# Altium PCB PCB_Z35.PcbDoc (part 1 of 3)
Units mm, origin at the board's own origin, x right, y up, seen from the top; angles counter-clockwise.
Board outline 116.46 x 196.34 mm, 2 copper layers (Top Layer, Bottom Layer), stack 1.671 mm thick; 178 components, 183 nets, 705 pads, 291 vias.
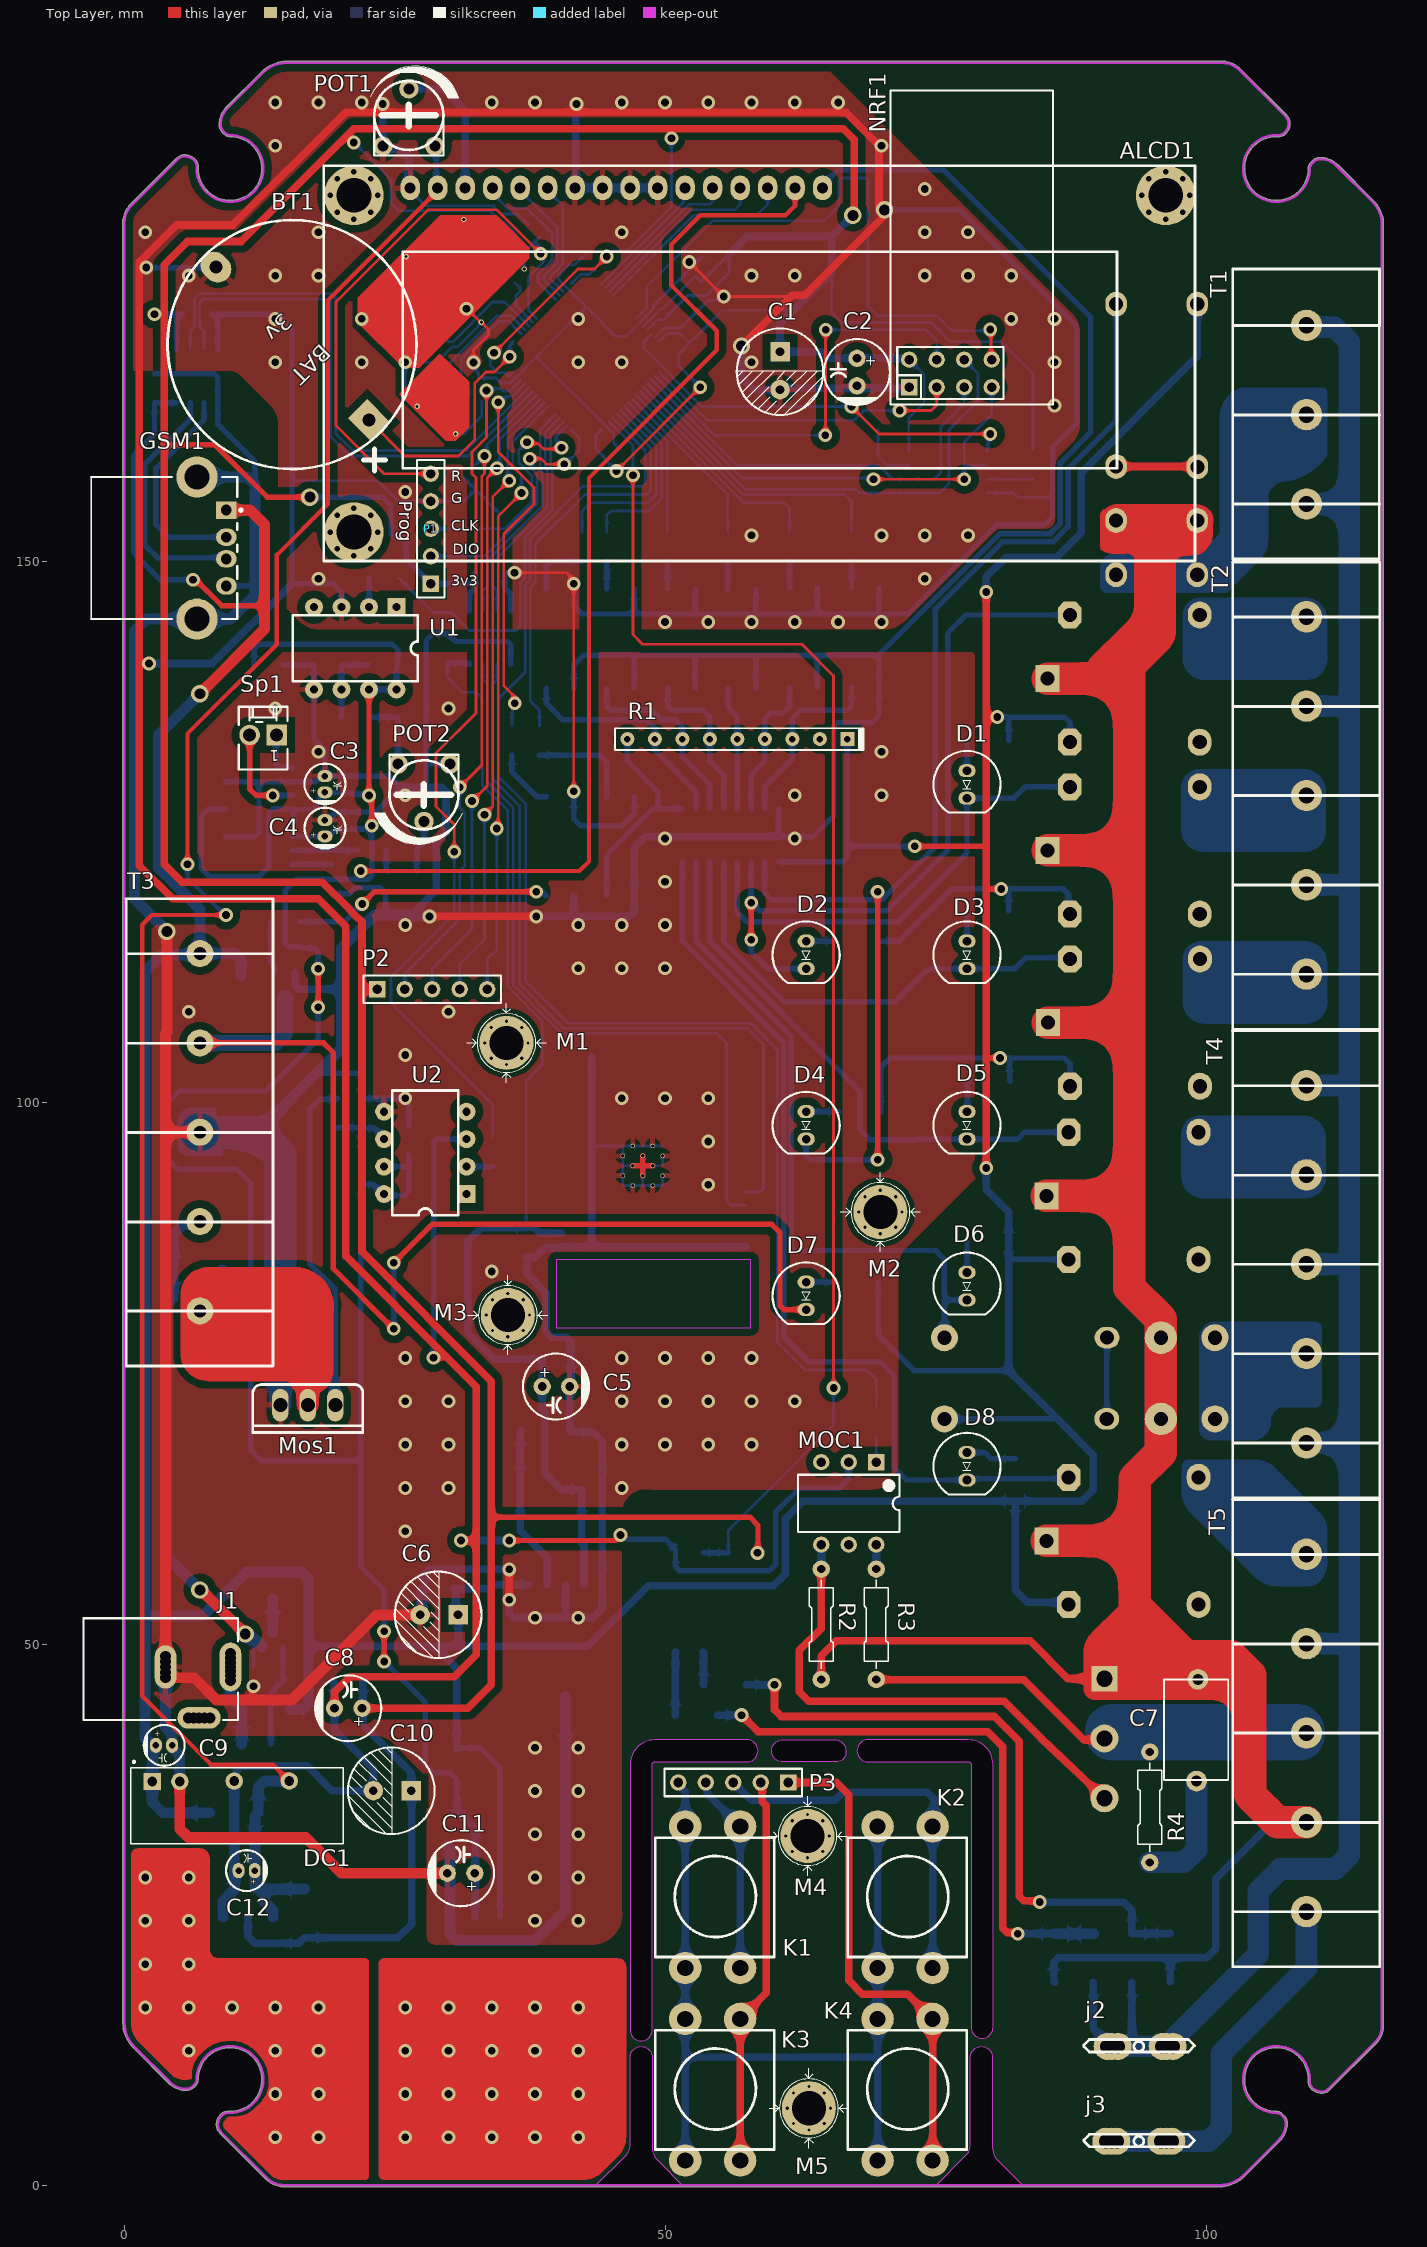
[diagram p0: Top Layer view]
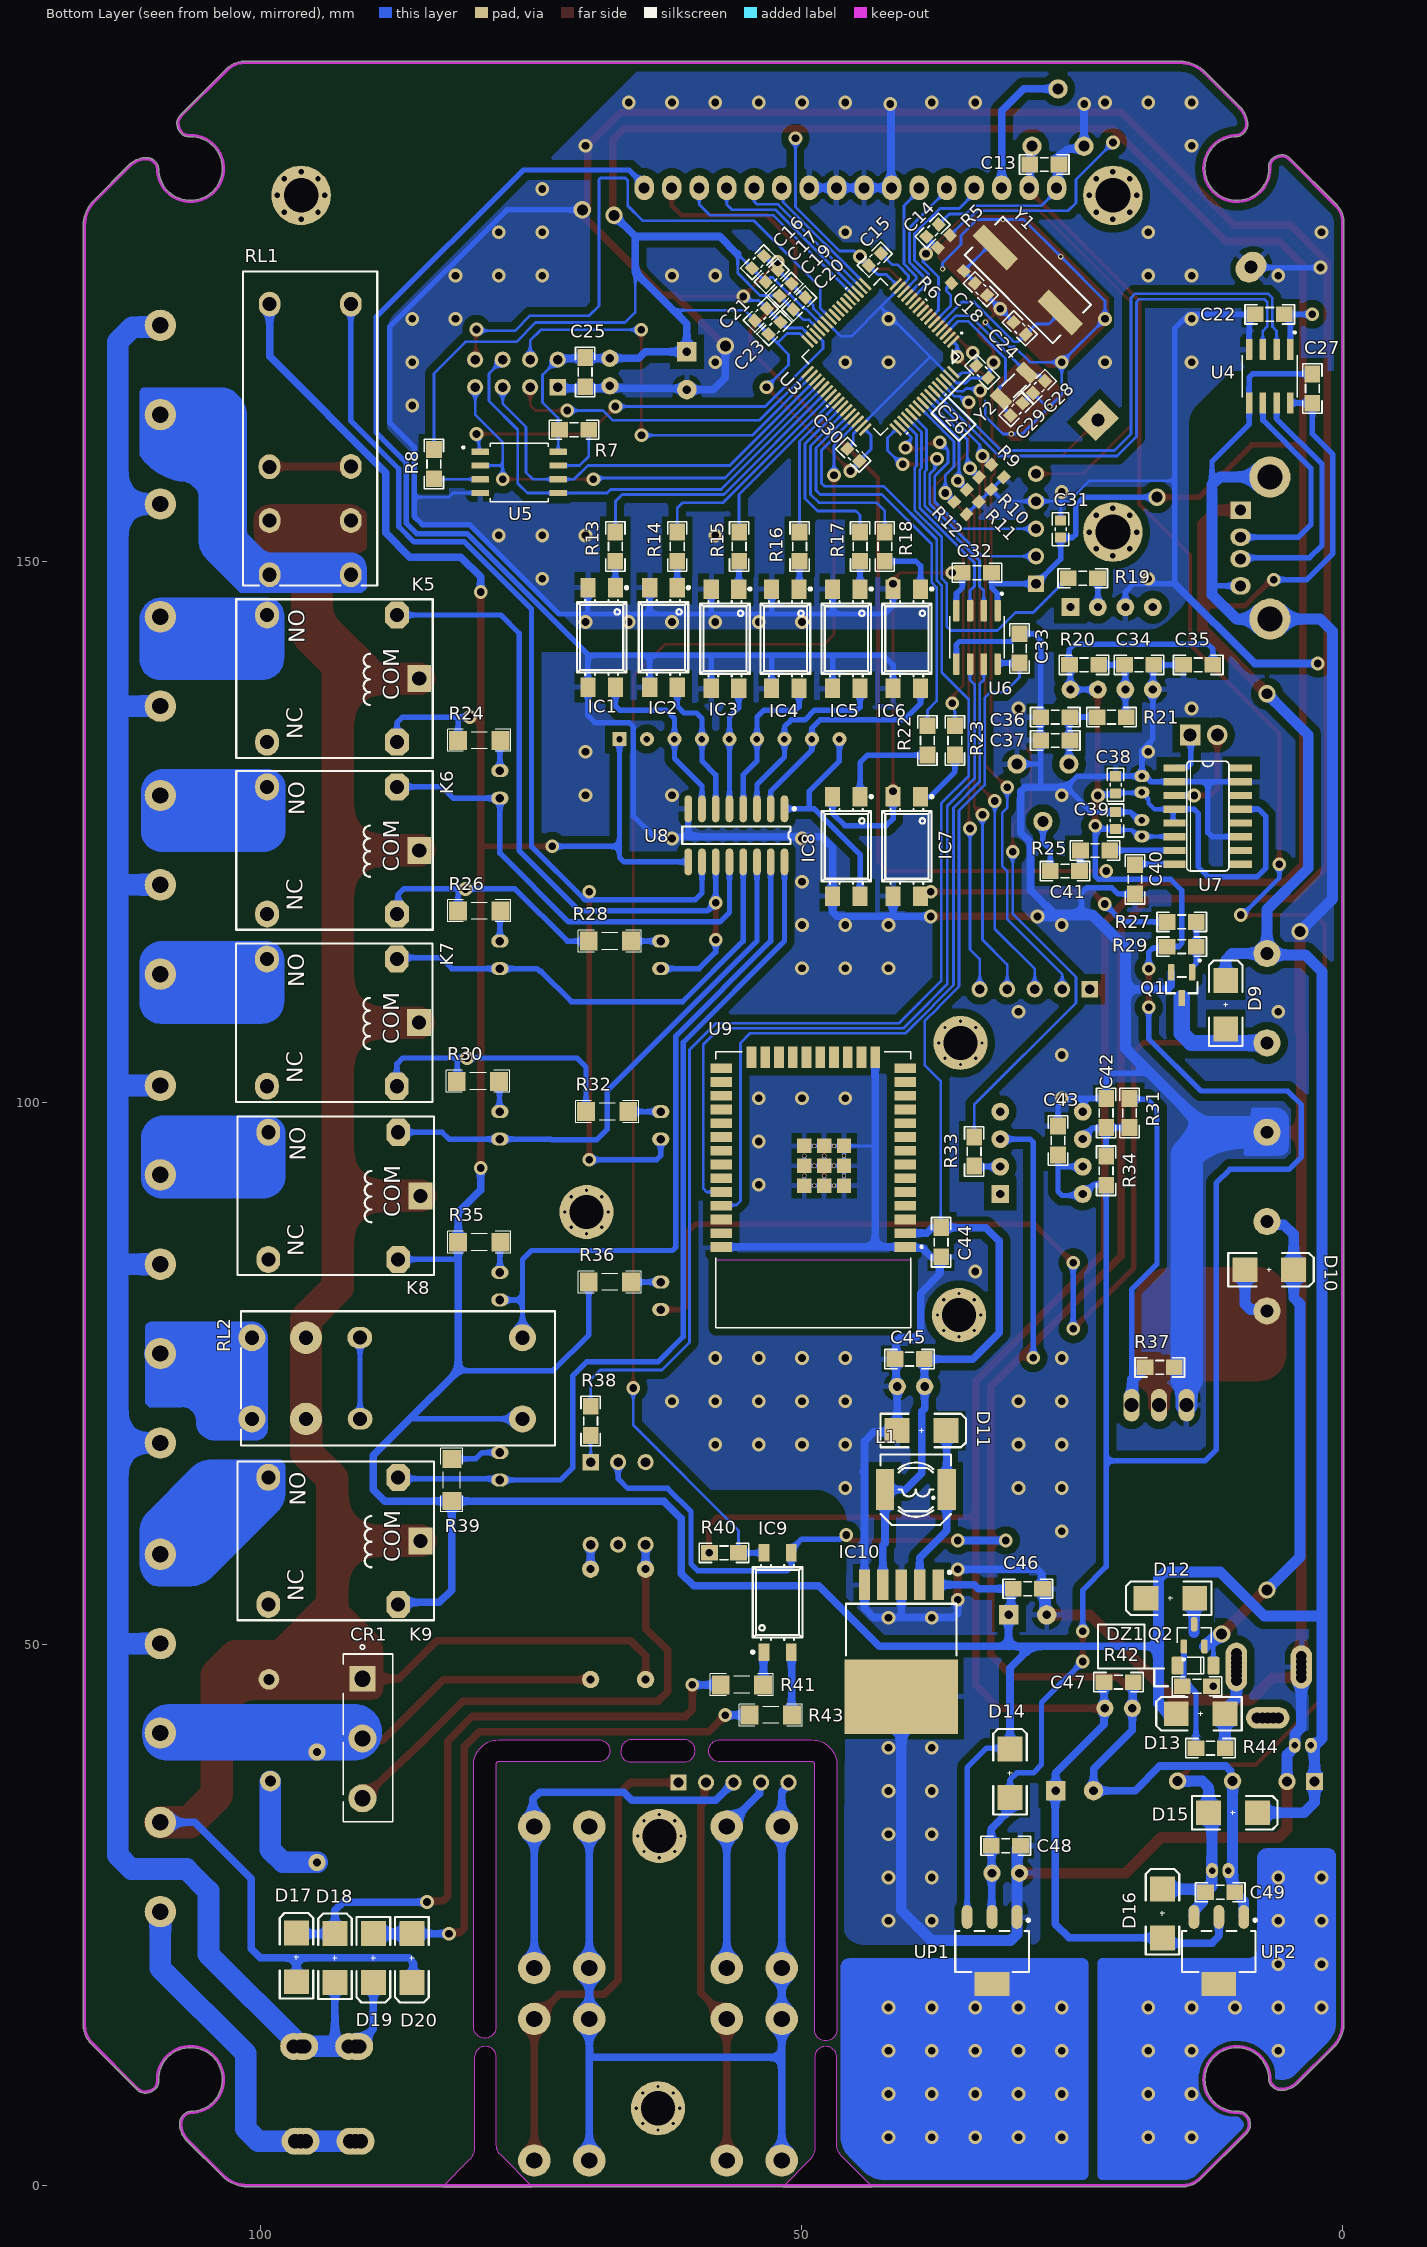
[diagram p1: Bottom Layer view, seen from below]

## Layer stack, top to bottom
Top Solder: solder mask 0.0102, Solder Resist, Dk 3.5
Top Layer: signal copper 0.0356
Dielectric 1: dielectric 1.6, FR-4, Dk 4.8
Bottom Layer: signal copper 0.0356
Bottom Solder: solder mask 0.0102, Solder Resist, Dk 3.5

## Board outline
4.107,9.429 ccw(c5.715,11.036) 5.715,8.763 ccw(c5.715,9.81) 6.455,9.069 6.579,9.193 ccw(c5.993,9.778) 6.821,9.778 cw(c9.766,9.766) 12.711,9.766 cw(c9.766,9.766) 9.779,6.821 9.541,6.821 ccw(c9.541,5.953) 8.927,6.567 8.905,6.545 ccw(c9.862,5.588) 8.509,5.588 ccw(c9.556,5.588) 8.815,4.848 13.124,0.539 ccw(c14.732,2.146) 14.404,-0.104 14.478,-0.127 101.219,-0.127 ccw(c101.219,3.066) 103.477,0.808 106.776,4.107 ccw(c105.169,5.715) 107.442,5.715 ccw(c106.395,5.715) 107.136,6.455 107.012,6.579 ccw(c106.427,5.993) 106.427,6.821 cw(c106.439,9.766) 109.384,9.766 cw(c106.441,9.766) 109.376,9.551 109.385,9.493 ccw(c110.252,9.541) 109.638,8.927 109.66,8.905 ccw(c110.617,9.862) 110.617,8.509 ccw(c110.617,9.556) 111.357,8.815 115.666,13.124 ccw(c114.059,14.732) 116.309,14.404 116.332,14.478 116.332,16.129 116.332,16.132 116.332,181.099 116.332,181.102 ccw(c113.139,181.102) 115.397,183.36 112.098,186.659 ccw(c110.49,185.052) 110.49,187.325 ccw(c110.49,186.278) 109.75,187.019 109.626,186.895 ccw(c110.212,186.31) 109.384,186.31 cw(c106.439,186.322) 106.669,189.258 106.733,189.269 ccw(c106.664,190.135) 107.278,189.521 107.3,189.543 ccw(c106.343,190.5) 107.696,190.5 ccw(c106.649,190.5) 107.39,191.24 103.081,195.549 ccw(c101.473,193.942) 101.801,196.192 101.727,196.215 100.076,196.215 14.986,196.215 ccw(c14.986,193.022) 12.728,195.28 9.429,191.981 ccw(c11.036,190.373) 8.763,190.373 ccw(c9.81,190.373) 9.047,189.656 9.06,189.642 9.187,189.515 9.193,189.509 ccw(c9.778,190.095) 9.778,189.267 cw(c9.766,186.322) 12.711,186.322 cw(c9.766,186.322) 6.829,186.537 6.82,186.595 ccw(c5.953,186.547) 6.567,187.161 6.545,187.183 ccw(c5.588,186.226) 5.588,187.579 ccw(c5.588,186.532) 4.848,187.273 0.539,182.964 ccw(c2.146,181.356) -0.104,181.684 -0.127,181.61 -0.127,179.959 -0.127,15.494 -0.127,14.986 ccw(c3.066,14.986) 0.808,12.728
cut-out: 74.866,-0.127 77.787,2.794 ccw(c76.868,3.714) 78.168,3.714 78.168,11.811 cw(c79.184,11.811) 79.184,12.827 cw(c79.184,11.811) 80.2,11.811 80.2,3.513 ccw(c81.935,3.513) 80.709,2.286 83.122,-0.127
cut-out: 68.707,41.148 ccw(c68.707,40.132) 67.691,40.132 ccw(c68.707,40.132) 68.707,39.116 77.978,39.116 cw(c77.978,38.862) 78.232,38.862 78.232,14.605 ccw(c79.248,14.605) 79.248,13.589 ccw(c79.248,14.605) 80.264,14.605 80.264,38.862 ccw(c77.978,38.862) 77.978,41.148
cut-out: 65.659,41.148 cw(c65.659,40.132) 66.675,40.132 66.675,40.005 cw(c65.786,40.005) 65.786,39.116 60.833,39.116 cw(c60.833,40.132) 59.817,40.132 cw(c60.833,40.132) 60.833,41.148
cut-out: 46.736,14.351 ccw(c47.752,14.351) 47.752,13.335 ccw(c47.752,14.351) 48.768,14.351 48.768,38.862 cw(c49.022,38.862) 49.022,39.116 57.531,39.116 ccw(c57.531,40.132) 58.547,40.132 ccw(c57.531,40.132) 57.531,41.148 49.022,41.148 ccw(c49.022,38.862) 46.736,38.862
cut-out: 43.434,-0.127 46.355,2.794 ccw(c45.435,3.714) 46.736,3.714 46.736,11.811 cw(c47.752,11.811) 47.752,12.827 cw(c47.752,11.811) 48.768,11.811 48.768,3.512 ccw(c50.502,3.512) 49.276,2.286 51.689,-0.127

## Design rules (kind name [scope] priority, off if disabled: settings)
Clearance [All] p1: gap=0.21 ignorepadtopadclearanceinfootprint=FALSE except(0.7: Arc-Poly Track-Poly SMDPad-Poly THPad-Poly Via-Poly Fill-Poly Poly-Poly Poly-Region Poly-Text Poly-Hole)
ComponentClearance [All] p1: gap=-10 collisioncheckmode=3 verticalgap=-10 showdistances=FALSE
Height [All] p1: minheight=0 maxheight=100.4 prefheight=12.7
PlaneConnect [All] p1: planeconnectstyle=Relief reliefexpansion=0.508 reliefentries=4 reliefconductorwidth=0.4 reliefairgap=0.4
PolygonConnect [All] p1: thpad.connectstyle=Relief thpad.reliefconductorwidth=0.5 thpad.reliefentries=4 thpad.polygonreliefangle="90 Angle" thpad.airgapwidth=0.5 smdpad.connectstyle=Relief smdpad.reliefconductorwidth=0.5 smdpad.reliefentries=4 smdpad.polygonreliefangle="90 Angle" smdpad.airgapwidth=0.5 via.connectstyle=Direct via.reliefconductorwidth=0 via.reliefentries=4 via.polygonreliefangle="90 Angle" via.airgapwidth=0
RoutingVias [All] p1: holewidth=0.711 width=1.27 viastyle="Through Hole" minholewidth=0.3 minwidth=0.3 maxholewidth=2 maxwidth=3
SolderMaskExpansion [All] p1: expansion=0.102 istentingtop=FALSE
SupplyNets "Schematic Supply Nets_4" [InNet('GND')] p1: voltage=0.000
SupplyNets "Schematic Supply Nets_3" [InNet('GND-3.3v')] p2: voltage=0.000
SupplyNets "Schematic Supply Nets_2" [InNet('3.3v')] p3: voltage=0.000
SupplyNets "Schematic Supply Nets_1" [InNet('+5')] p4: voltage=0.000
SupplyNets "Schematic Supply Nets" [InNet('GND-12v')] p5: voltage=0.000
Width [All] p1: maxlimit=3 minlimit=0.25 preferedwidth=0.65
27 further rules are at their usual default settings.

## Components (designator, comment, footprint, x,y, rotation, side; value= is the part's Value field where it differs from the comment)
ALCD1 "LCD" "LCD 16x2" 26.416,184.531 r0 top
BT1 "CR2032" "BAT BACKUP" 22.606,163.068 r225 top
C1 "1000uF" "Cap electrolitic radial 8x14-3.5" 60.579,167.64 r270 top value=1uF (schematic designator C6)
C2 "10uF" "Cap electrolitic radial 6.3x12-2.5" 67.691,168.783 r270 top value=1uF (schematic designator C41)
C3 "10uF" "Cap electrolitic radial 4x7-1.5" 18.535,128.686 r90 top value=1uF (schematic designator C7)
C4 "100uF" "Cap electrolitic radial 4x7-1.5" 18.542,124.611 r90 top value=1uF (schematic designator C11)
C5 "220uF" "Cap electrolitic radial 6.3x12-2.5" 38.608,73.787 r0 top value=1uF (schematic designator C13)
C6 "1000uF" "Cap electrolitic radial 8x14-3.5" 29.083,52.697 r180 top value=1uF (schematic designator C15)
C7 "100nF/400v" "Cap - 100nF - 400V" 99.06,38.227 r90 top (schematic designator C4)
C8 "10uF" "Cap electrolitic radial 6.3x12-2.5" 21.963,44.069 r180 top value=1uF (schematic designator C22)
C9 "2.2uF-50v" "Cap electrolitic radial 4x7-1.5" 2.921,40.64 r0 top value=1uF (schematic designator C25)
C10 "1000u" "Cap electrolitic radial 8x14-3.5" 24.757,36.449 r180 top value=1uF (schematic designator C23)
C11 "10uF" "Cap electrolitic radial 6.3x12-2.5" 32.385,28.829 r180 top value=1uF (schematic designator C37)
C12 "10uF-50v" "Cap electrolitic radial 4x7-1.5" 12.053,29.067 r180 top value=1uF (schematic designator C26)
C13 "100nF" CAPC3413X12N 27.559,186.69 r180 bottom (schematic designator C1)
C14 "100nF" CAPC1608X90 37.846,180.594 r135 bottom (schematic designator C30)
C15 "100nF" CAPC1608X90 43.18,177.927 r135 bottom (schematic designator C20)
C16 "1uF" CAPC1608X90 53.975,177.673 r135 bottom (schematic designator C33)
C17 "100nF" CAPC1608X90 52.705,176.403 r135 bottom (schematic designator C34)
C18 "15pF" CAPC1608X90 33.401,175.133 r225 bottom (schematic designator C36)
C19 "1uF" CAPC1608X90 51.435,175.133 r135 bottom (schematic designator C28)
C20 "10nF" CAPC1608X90 50.165,173.863 r135 bottom (schematic designator C29)
C21 "4.7uF" CAPC1608X90 53.721,172.847 r135 bottom (schematic designator C17)
C22 "100nF" CAPC3413X12N 6.731,172.847 r0 bottom (schematic designator C48)
C23 "100nF" CAPC1608X90 52.451,171.577 r135 bottom (schematic designator C19)
C24 "15pF" CAPC1608X90 29.845,171.577 r45 bottom (schematic designator C35)
C25 "100nF" CAPC3413X12N 69.977,167.513 r90 bottom (schematic designator C5)
C26 "100nF" CAPC1608X90 33.274,167.513 r225 bottom (schematic designator C21)
C27 "100nF" CAPC3413X12N 2.794,165.989 r90 bottom (schematic designator C47)
C28 "15pF" CAPC1608X90 28.067,166.116 r315 bottom (schematic designator C32)
C29 "15pF" CAPC1608X90 30.099,164.084 r135 bottom (schematic designator C31)
C30 "100nF" CAPC1608X90 45.212,159.893 r45 bottom (schematic designator C18)
C31 "100nF" CAPC1608X90 26.035,153.035 r90 bottom (schematic designator C40)
C32 "100nF" CAPC3413X12N 33.782,148.971 r0 bottom (schematic designator C44)
C33 "100nF" CAPC3413X12N 29.845,141.986 r90 bottom (schematic designator C43)
C34 "15pF" CAPC3413X12N 18.796,140.462 r180 bottom (schematic designator C42)
C35 "100nF" CAPC3413X12N 13.335,140.462 r0 bottom (schematic designator C38)
C36 "100nF" CAPC3413X12N 26.543,135.636 r0 bottom (schematic designator C45)
C37 "100nF" CAPC3413X12N 26.543,133.477 r0 bottom (schematic designator C46)
C38 "100nF" CAPC1608X90 20.955,129.413 r90 bottom (schematic designator C8)
C39 "100nF" CAPC1608X90 20.955,126.111 r90 bottom (schematic designator C9)
C40 "100nF" CAPC3413X12N 19.177,120.65 r270 bottom (schematic designator C10)
C41 "470nF" CAPC3413X12N 25.654,121.412 r0 bottom (schematic designator C12)
C42 "15pF" CAPC3413X12N 21.844,99.06 r90 bottom (schematic designator C3)
C43 "100nF" CAPC3413X12N 26.289,96.52 r90 bottom (schematic designator C2)
C44 "100nF" CAPC3413X12N 37.084,87.122 r270 bottom (schematic designator C49)
C45 "100nF" CAPC3413X12N 40.005,76.327 r0 bottom (schematic designator C14)
C46 "100nF" CAPC3413X12N 29.083,55.11 r180 bottom (schematic designator C16)
C47 "100nF" CAPC3413X12N 20.693,46.482 r180 bottom (schematic designator C24)
C48 "100nF" CAPC3413X12N 31.115,31.369 r180 bottom (schematic designator C39)
C49 "100nF" CAPC3413X12N 11.303,27.067 r180 bottom (schematic designator C27)
CR1 "BTA41" BTA41 115.951,78.296 r270 bottom
D1 "LED 5MM" LED5MM_YELLOW 77.851,129.413 r270 top (schematic designator D3)
D2 "LED 5MM" LED5MM_YELLOW 62.992,113.665 r270 top (schematic designator D1)
D3 "LED 5MM" LED5MM_YELLOW 77.851,113.665 r270 top (schematic designator D4)
D4 "LED 5MM" LED5MM_YELLOW 62.992,97.917 r270 top (schematic designator D6)
D5 "LED 5MM" LED5MM_YELLOW 77.851,97.917 r270 top (schematic designator D2)
D6 "LED 5MM" LED5MM_YELLOW 77.851,83.058 r270 top (schematic designator D8)
D7 "LED 5MM" LED5MM_YELLOW 62.992,82.169 r270 top (schematic designator D13)
D8 "LED 5MM" LED5MM_YELLOW 77.851,66.421 r270 top (schematic designator D5)
D9 "SMD 1N4007" "DIODE SMD" 10.795,106.807 r90 bottom (schematic designator D10)
D10 "SMD 1N4007" "DIODE SMD" 9.017,84.582 r180 bottom (schematic designator D7)
D11 "SS34" "DIODE SMD" 41.148,69.723 r180 bottom (schematic designator D15)
D12 "SS34" "DIODE SMD" 13.661,54.229 r0 bottom (schematic designator D19)
D13 "SS34" "DIODE SMD" 10.867,43.561 r0 bottom (schematic designator D20)
D14 "SMD 1N4007" "DIODE SMD" 30.726,35.814 r90 bottom (schematic designator D18)
D15 "SMD 1N4007" "DIODE SMD" 12.374,34.417 r180 bottom (schematic designator D16)
D16 "SMD 1N4007" "DIODE SMD" 16.637,22.86 r90 bottom (schematic designator D17)
D17 "SMD 1N4007" "DIODE SMD" 96.647,18.796 r90 bottom (schematic designator D14)
D18 "SMD 1N4007" "DIODE SMD" 93.091,18.741 r90 bottom (schematic designator D11)
D19 "SMD 1N4007" "DIODE SMD" 89.535,23.241 r270 bottom (schematic designator D9)
D20 "SMD 1N4007" "DIODE SMD" 85.979,23.241 r270 bottom (schematic designator D12)
DC1 "B1205S-2WR3" CONV_RKZE-1205S/HP 10.414,35.052 r0 top
DZ1 "6.2V" "SOD80, LL-34" 13.589,48.006 r0 bottom value=12V
GSM1 "USB Connector" USB2.5-2H4C 3.937,151.257 r180 top
IC1 "PC817" WURTH_140817143400#1 68.453,143.002 r270 bottom
IC2 "PC817" WURTH_140817143400#1 62.738,143.002 r270 bottom (schematic designator IC3)
IC3 "PC817" WURTH_140817143400#1 57.056,142.875 r270 bottom (schematic designator IC5)
IC4 "PC817" WURTH_140817143400#1 51.476,142.875 r270 bottom (schematic designator IC7)
IC5 "PC817" WURTH_140817143400#1 45.847,142.875 r270 bottom (schematic designator IC2)
IC6 "PC817" WURTH_140817143400#1 40.259,142.875 r270 bottom (schematic designator IC4)
IC7 "PC817" WURTH_140817143400#1 40.259,123.698 r270 bottom (schematic designator IC9)
IC8 "PC817" WURTH_140817143400#1 45.847,123.698 r270 bottom (schematic designator IC6)
IC9 "PC817" WURTH_140817143400#2 52.197,53.848 r90 bottom (schematic designator IC10)
IC10 "LM2596-3v3" TO170P1435X465-6N-R1041X635 40.767,49.276 r270 bottom (schematic designator IC8)
J1 "DC Power Jack" "DC Power Jack 1" 9.81,48.679 r0 top
j2 "Cooler Conector" "Cooler Conector" 91.186,12.827 r0 top (schematic designator j3)
j3 "Cooler Conector" "Cooler Conector" 91.186,4.064 r0 top (schematic designator j2)
K1 "Key-12*12" Switch_11_11 48.006,37.973 r270 top (schematic designator K6)
K2 "Key-12*12" Switch_11_11 65.786,37.973 r270 top (schematic designator K7)
K3 "Key-12*12" Switch_11_11 48.006,20.193 r270 top (schematic designator K8)
K4 "Key-12*12" Switch_11_11 65.786,20.193 r270 top (schematic designator K9)
K5 "Relay" "Relay 18.85x15.35x15.70" 92.329,139.192 r90 bottom (schematic designator K1)
K6 "Relay" "Relay 18.85x15.35x15.70" 92.329,123.317 r90 bottom (schematic designator K3)
K7 "Relay" "Relay 18.85x15.35x15.70" 92.351,107.409 r90 bottom (schematic designator K4)
K8 "Relay" "Relay 18.85x15.35x15.70" 92.224,91.407 r90 bottom (schematic designator K2)
K9 "Relay" "Relay 18.85x15.35x15.70" 92.224,59.53 r90 bottom (schematic designator K5)
L1 "33uH" IND_PANASONIC_ELL6RH 39.426,64.262 r0 bottom
M1 "Screw3mm" "Board Screw 3mm" 35.306,105.537 r0 top (schematic designator M3)
M2 "Screw3mm" "Board Screw 3mm" 69.85,89.916 r0 top (schematic designator M5)
M3 "Screw3mm" "Board Screw 3mm" 35.433,80.391 r0 top (schematic designator M4)
M4 "Screw3mm" "Board Screw 3mm" 63.119,32.258 r0 top (schematic designator M2)
M5 "Screw3mm" "Board Screw 3mm" 63.246,7.112 r0 top (schematic designator M1)
MOC1 "MOC3021" DIP-6 66.929,62.992 r270 top
Mos1 "IRFZ44" TO-220 16.955,72.072 r180 top
NRF1 "NRF24L01+" NRF24L01P 72.517,166.116 r0 top
P1 "Prog" HDR1X5 28.321,147.955 r90 top (schematic designator P3)
P2 "Header 5" HDR1X5 23.368,110.49 r0 top locked (schematic designator P1)
P3 "Header 5" HDR1X5 61.341,37.211 r180 top (schematic designator P2)
POT1 "10K" "POT 4" 26.289,191.025 r0 top
POT2 "10K" "POT 4" 27.686,128.651 r180 top
Q1 "AO3400-5.8A" SOT95P260X140-3N 14.859,110.871 r270 bottom (schematic designator Q2)
Q2 "IRLML6402TRPBF" SOT95P237X112-3N 13.716,50.8 r90 bottom (schematic designator Q3)
R1 "Array Resistor-4K7" "Res Array" 66.802,133.604 r270 top value=4K7 (schematic designator R44)
R2 "360R" "Axial 0_25 W, 0_4 IN LEAD PITCH" 64.389,51.816 r90 top (schematic designator R22)
R3 "360R" "Axial 0_25 W, 0_4 IN LEAD PITCH" 69.469,51.816 r90 top (schematic designator R20)
R4 "100R" "Axial 0_25 W, 0_4 IN LEAD PITCH" 94.742,34.925 r270 top (schematic designator R16)
R5 "10K" RESC1608X55N 36.83,179.578 r135 bottom value=100k (schematic designator R38)
R6 "1K2" RESC1608X55N 35.56,176.276 r315 bottom value=100k (schematic designator R39)
R7 "10K" RESC3413X04N 70.993,162.179 r0 bottom (schematic designator R32)
R8 "10K" RESC3413X04N 83.947,159.004 r90 bottom (schematic designator R30)
R9 "10K" RESC1608X55N 31.877,158.369 r45 bottom value=100k (schematic designator R33)
R10 "10K" RESC1608X55N 33.02,157.226 r45 bottom value=100k (schematic designator R34)
R11 "10K" RESC1608X55N 34.163,156.083 r45 bottom value=100k (schematic designator R35)
R12 "10K" RESC1608X55N 35.306,154.94 r45 bottom value=100k (schematic designator R36)
R13 "270R" RESC3413X04N 67.183,151.384 r90 bottom (schematic designator R1)
R14 "270R" RESC3413X04N 61.468,151.384 r90 bottom (schematic designator R5)
R15 "270R" RESC3413X04N 55.753,151.384 r90 bottom (schematic designator R8)
R16 "270R" RESC3413X04N 50.165,151.384 r90 bottom (schematic designator R12)
R17 "270R" RESC3413X04N 44.577,151.384 r90 bottom (schematic designator R2)
R18 "270R" RESC3413X04N 42.291,151.384 r90 bottom (schematic designator R6)
R19 "270R" RESC3413X04N 24.003,148.463 r0 bottom (schematic designator R28)
R20 "220R" RESC3413X04N 23.876,140.462 r0 bottom (schematic designator R13)
R21 "1K" RESC3413X04N 21.336,135.636 r180 bottom (schematic designator R40)
R22 "270R" RESC3413X04N 38.354,133.477 r90 bottom (schematic designator R9)
R23 "270R" RESC3413X04N 35.814,133.477 r90 bottom (schematic designator R41)
R24 "1K" RESC4817X04N 79.756,133.477 r180 bottom (schematic designator R7)
R25 "20K" RESC3413X04N 22.86,123.317 r180 bottom (schematic designator R37)
R26 "1K" RESC4817X04N 79.756,117.729 r180 bottom (schematic designator R10)
R27 "270R" RESC3413X04N 14.859,116.713 r180 bottom (schematic designator R29)
R28 "1K" RESC4817X04N 67.691,114.935 r180 bottom (schematic designator R3)
R29 "10K" RESC3413X04N 14.859,114.427 r0 bottom (schematic designator R31)
R30 "1K" RESC4817X04N 79.883,101.981 r180 bottom (schematic designator R4)
R31 "100R" RESC3413X04N 19.685,99.06 r270 bottom (schematic designator R18)
R32 "1K" RESC4817X04N 67.945,99.187 r180 bottom (schematic designator R14)
R33 "270R" RESC3413X04N 34.036,95.504 r90 bottom (schematic designator R17)
R34 "220R" RESC3413X04N 21.844,93.726 r270 bottom (schematic designator R15)
R35 "1K" RESC4817X04N 79.756,87.122 r180 bottom (schematic designator R23)
R36 "1K" RESC4817X04N 67.691,83.439 r0 bottom (schematic designator R27)
R37 "10K" RESC3413X04N 16.892,75.565 r0 bottom (schematic designator R21)
R38 "270R" RESC3413X04N 69.469,70.612 r90 bottom (schematic designator R19)
R39 "1K" RESC4817X04N 82.296,65.151 r90 bottom (schematic designator R11)
R40 "10K" RESC3413X04N 57.15,58.42 r180 bottom (schematic designator R24)
R41 "100K" RESC4817X04N 55.499,46.228 r180 bottom (schematic designator R25)
R42 "10K" RESC3413X04N 13.462,46.101 r180 bottom (schematic designator R43)
R43 "100K" RESC4817X04N 52.832,43.434 r180 bottom (schematic designator R26)
R44 "100R" RESC3413X04N 12.192,40.386 r180 bottom (schematic designator R42)
RL1 "REL_FINDER_40.61" REL_FINDER_40.61#1 95.377,161.29 r270 bottom value=9VDC
RL2 "REL_FINDER_40.61" REL_FINDER_40.61#2 88.265,74.549 r0 bottom value=9VDC
Sp1 "KK®" MOLEX_22-04-1021 12.827,133.985 r180 top
T1 "DG35-5pin" DG35-5pin#1 115.976,193.396 r180 top (schematic designator T3)
T2 "DG35-5pin" DG35-5pin#2 115.976,149.962 r180 top (schematic designator T4)
T3 "DG35-5pin" DG35-5pin#3 13.741,118.847 r180 top (schematic designator T7)
T4 "DG35-5pin" DG35-5pin#2 115.976,106.655 r180 top (schematic designator T5)
T5 "DG35-5pin" DG35-5pin#2 115.976,63.348 r180 top (schematic designator T6)
U1 "6N137" DIP8 25.146,145.796 r270 top (schematic designator U8)
U2 "6N137" DIP8 31.623,91.567 r180 top (schematic designator U3)
U3 "STM32G431RBT6" LQFP64-10X10MM 42.682,168.924 r315 bottom (schematic designator U6)
U4 "CA-IS3722HS" SOIC127P599X175-8N 6.731,167.132 r270 bottom (schematic designator U9)
U5 "W25Q64BVSSIG" SOIC127P790X216-8N 76.073,158.242 r180 bottom (schematic designator U4)
U6 "CA-IS3722HS" SOIC127P599X175-8N 33.782,143.002 r270 bottom (schematic designator U7)
U7 "PAM8403" SOP-16 12.446,126.492 r180 bottom (schematic designator U5)
U8 "ULN2003A" SO16_M 56.007,124.714 r270 bottom (schematic designator U2)
U9 "ESP32-WROOM-32D-N4" MODULE_ESP32-WROOM-32D-N4 48.895,91.948 r0 bottom (schematic designator U1)
UP1 "5v" SOT223 32.385,21.59 r270 bottom (schematic designator UP2)
UP2 "3.3v" SOT223 11.43,21.59 r270 bottom (schematic designator UP1)
Y1 "8MHz" "Crystal SMD" 29.083,176.022 r45 bottom value="12 MHz" (schematic designator Y2)
Y2 "32.768KHZ" XTAL_ABS09-32.768KHZ-T 30.353,166.243 r315 bottom (schematic designator Y1)

## Footprints (in the part's own frame and the unit in brackets; to place one, negate y for a bottom-side part, rotate by r counter-clockwise, add the part's x,y. Pads: shape width x height; smd on the part's side, far side on the other; paste and mask are expansions set on the pad)
"Axial 0_25 W, 0_4 IN LEAD PITCH" [mm] "Designer Abbas Basereh"
  round 1.6 hole 0.75: 1(5.1,0) 2(-5.1,0)
  silkscreen extent -4.1,-1.1 4.1,1.1, body extent -5.4,-1.16 5.36,1.16, height 3.63
"BAT BACKUP" [mm]
  rect 2.5x3 hole 1.2: 1(0,0)
  oval 2.5x3 hole 1.2: 2(0,-20)
  silkscreen extent -11.41,-21.47 11.59,1.53, body extent -11.5,-24.72 11.5,2.72, height 9.17
"Board Screw 3mm" [mm]
  round 5 hole 3.15 mask+0.1: S(0,0)
  silkscreen extent -3.68,-3.68 3.68,3.68
BTA41 [mm]
  rect 2.388x2.388 hole 1.5: 1(31.496,25.4)
  round 2.6 hole 1.5: 2(37.021,25.4) 3(42.546,25.4)
  silkscreen extent 28.37,23.62 44.7,28.19, body extent 29.23,23.59 44.73,28.19, height 24.53
"Cap - 100nF - 400V" [mil]
  round 75 hole 40: 1(-35,0) 2(335,-5)
  silkscreen extent -31,-115 334,118, body extent -31,-115 334,118, height 460
"Cap electrolitic radial 4x7-1.5" [mm] "Cap electrolitic radial 5x11-2-Design:Ali Hafizi"
  oval 1.1x1.4 hole 0.6: 1(0,0) 2(1.5,0)
  silkscreen extent -1.12,-1.89 2.65,1.89, body extent -1.25,-2 2.75,2, height 8.5
"Cap electrolitic radial 6.3x12-2.5" [mm] "Capacitor Electrolytic D=6.3 x H=12 - P=2.5 mm, Altium Compatible"
  round 1.6 hole 0.8: 1(0,0) 2(2.54,0)
  silkscreen extent -1.78,-3.04 4.32,3.05, body extent -1.87,-3.09 4.43,3.2, height 1.2
"Cap electrolitic radial 8x14-3.5" [mm] "Cap electrolitic radial 8x14-3.5-Design:Abbas Basereh"
  rect 1.8x1.8 hole 0.8: 1(-1.75,0)
  round 1.8 hole 0.8: 2(1.75,0)
  silkscreen extent -3.9,-4 4.1,4, body extent -4.1,-4.1 4.1,4.1, height 14.6
CAPC1608X90 [mm]
  rect 0.94x1.02 smd: 1(-0.821,0.01) 2(0.759,0.01)
  silkscreen extent -1.56,-0.75 1.49,0.77, body extent -0.8,-0.44 0.8,0.51, height 0.8
CAPC3413X12N [mm] "Chip Capacitor, 2-Leads, Body 3/40x1/30mm, IPC Medium Density-Design:Abbas Basereh"
  rect 1.55x1.45 smd: 1(-1.35,0) 2(1.35,0)
  silkscreen extent -2.29,-0.89 2.29,0.89, body extent -1,-0.63 1,0.62, height 0.78
CONV_RKZE-1205S/HP [mm]
  rect 1.6x1.6 hole 0.9: 1(-7.825,2.255)
  round 1.6 hole 0.9: 2(-5.285,2.255) 5(-0.254,2.286) 7(4.826,2.286)
  silkscreen extent -9.82,-3.52 9.82,4.16, body extent -9.82,-3.52 9.82,3.52, height 9.7
"Cooler Conector" [mm]
  round 2.5 hole 1.3: 1(0,0) 1(5.08,0)
  silkscreen extent -2.54,-0.51 7.68,0.64
"Crystal SMD" [mm] "DESIGNER ABBAS BASEREH"
  rect 4.5x1.5 smd: 1(-4.25,0) 2(4.25,0)
  silkscreen extent -5.75,-2.5 5.75,2.5, body extent -6.21,-2.25 6.09,2.25, height 5.18
"DC Power Jack 1" [mm] "Power Adaptor Jack"
  round 1.5 hole 1: 1(0,-2.05) 1(0,-1.6) 1(0,-1.2) 1(0,-0.4) 1(0,0) 1(0,0.45) 2(-6,-1.8) 2(-6,-1.3) 2(-6,-0.3) 2(-6,0.2) 3(-3.9,-5.5) 3(-3.4,-5.5) 3(-2.4,-5.5) 3(-1.9,-5.5)
  oval 2x4.5 hole 1: 1(0,-0.8)
  oval 2x4 hole 1: 2(-6,-0.8)
  oval 4x2 hole 1: 3(-2.9,-5.5)
  silkscreen extent -13.59,-5.7 0.7,3.7, body extent -13.68,-5.74 0.72,3.66, height 11.05
DG35-5pin#1 [mm] "DG35-5pin"
  round 2.9 hole 1.5: 1(6.756,38.075) 2(6.756,29.82) 3(6.756,21.565)
  silkscreen extent 0,16.36 13.56,43.15
DG35-5pin#2 [mm] "DG35-5pin"
  round 2.9 hole 1.5: 1(6.756,38.075) 2(6.756,29.82) 3(6.756,21.565) 4(6.756,13.31) 5(6.756,5.055)
  silkscreen extent 0,0 13.6,43.15
DG35-5pin#3 [mm] "DG35-5pin"
  round 2.5 hole 1.2: 1(6.756,38.075) 2(6.756,29.82) 3(6.756,21.565) 4(6.756,13.31) 5(6.756,5.055)
  silkscreen extent 0,0 13.6,43.15
"DIODE SMD" [mm]
  rect 2.3x2.3 smd: 1(0,0) 2(4.5,0)
  silkscreen extent -1.55,-1.55 6.35,1.55, body extent -0.28,-1.32 4.82,1.28, height 2.31
DIP8 [mil]
  rect 65x65 hole 30: 1(0,0)
  round 65 hole 30: 2(0,-100) 3(0,-200) 4(0,-300) 5(300,-300) 6(300,-200) 7(300,-100) 8(300,0)
  silkscreen extent 30,-377 270,77, body extent -5,-375 305,75, height 165
DIP-6 [mm] "DIP; 6 Leads; Row Spacing 7.62 mm; Pitch 2.54 mm"
  rect 1.5x1.5 hole 0.9: 1(-3.81,2.54)
  round 1.5 hole 0.9: 2(-3.81,0) 3(-3.81,-2.54) 4(3.81,-2.54) 5(3.81,0) 6(3.81,2.54)
  silkscreen extent -2.65,-4.7 2.65,4.7
HDR1X5 [mm] "Connector; Header; 5 Position"
  rect 1.5x1.5 hole 0.9: 1(0,0)
  round 1.5 hole 0.9: 2(2.54,0) 3(5.08,0) 4(7.62,0) 5(10.16,0)
  silkscreen extent -1.27,-1.27 11.43,1.27, body extent -1.28,-1.27 11.42,1.27, height 8.38
IND_PANASONIC_ELL6RH [mm] "SMD Choke Coil, Body 6.9x6.5mm"
  rect 1.7x3.8 smd: 1(-2.85,0) 2(2.85,0)
  silkscreen extent -3.25,-3.25 3.25,3.25, body extent -3.45,-3.25 3.45,3.25, height 2.8
"LCD 16x2" [mm] "Character LCD, 2 Row, 16 Colunm"
  oval 1.778x2.286 hole 1.016: 1(0,0) 2(2.54,0) 3(5.08,0) 4(7.62,0) 5(10.16,0) 6(12.7,0) 7(15.24,0) 8(17.78,0) 9(20.32,0) 10(22.86,0) 11(25.4,0) 12(27.94,0) 13(30.48,0) 14(33.02,0) 15(35.56,0) 16(38.1,0)
  round 0.6 hole 0.5: MH(-7.4,-31.8) MH(-7.4,-0.7) MH(-6.756,-33.356) MH(-6.756,-30.244) MH(-6.756,-2.256) MH(-6.756,0.856) MH(-5.2,-34) MH(-5.2,-29.6) MH(-5.2,-2.9) MH(-5.2,1.5) MH(-3.644,-33.356) MH(-3.644,-30.244) MH(-3.644,-2.256) MH(-3.644,0.856) MH(-3,-31.8) MH(-3,-0.7) MH(67.6,-0.7) MH(68.244,-2.256) MH(68.244,0.856) MH(69.8,-2.9) MH(69.8,1.5) MH(71.356,-2.256) MH(71.356,0.856) MH(72,-0.7)
  round 5.5 hole 3.2: MH(-5.2,-31.8) MH(-5.2,-0.7) MH(69.8,-0.7)
  silkscreen extent -7.99,-34.47 72.51,2.03, body extent -7.99,-34.47 72.51,2.03, height 25.52
LED5MM_YELLOW [mm] "LED 5MM THROUGH HOLE YELLOW-Designer Abbas Basereh"
  oval 1.2x1.6 hole 0.8: 1(-1.27,0) 2(1.27,0)
  silkscreen extent -3.1,-3.1 2.6,3.1, body extent -3,-3.01 2.42,3.01, height 12.31
LQFP64-10X10MM [mm]
  rrect50% 1.473x0.279 smd: 1(-5.75,3.75) 2(-5.75,3.25) 3(-5.75,2.75) 4(-5.75,2.25) 5(-5.75,1.75) 6(-5.75,1.25) 7(-5.75,0.75) 8(-5.75,0.25) 9(-5.75,-0.25) 10(-5.75,-0.75) 11(-5.75,-1.25) 12(-5.75,-1.75) 13(-5.75,-2.25) 14(-5.75,-2.75) 15(-5.75,-3.25) 16(-5.75,-3.75) 33(5.75,-3.75) 34(5.75,-3.25) 35(5.75,-2.75) 36(5.75,-2.25) 37(5.75,-1.75) 38(5.75,-1.25) 39(5.75,-0.75) 40(5.75,-0.25) 41(5.75,0.25) 42(5.75,0.75) 43(5.75,1.25) 44(5.75,1.75) 45(5.75,2.25) 46(5.75,2.75) 47(5.75,3.25) 48(5.75,3.75)
  rrect50% 0.279x1.473 smd: 17(-3.75,-5.75) 18(-3.25,-5.75) 19(-2.75,-5.75) 20(-2.25,-5.75) 21(-1.75,-5.75) 22(-1.25,-5.75) 23(-0.75,-5.75) 24(-0.25,-5.75) 25(0.25,-5.75) 26(0.75,-5.75) 27(1.25,-5.75) 28(1.75,-5.75) 29(2.25,-5.75) 30(2.75,-5.75) 31(3.25,-5.75) 32(3.75,-5.75) 49(3.75,5.75) 50(3.25,5.75) 51(2.75,5.75) 52(2.25,5.75) 53(1.75,5.75) 54(1.25,5.75) 55(0.75,5.75) 56(0.25,5.75) 57(-0.25,5.75) 58(-0.75,5.75) 59(-1.25,5.75) 60(-1.75,5.75) 61(-2.25,5.75) 62(-2.75,5.75) 63(-3.25,5.75) 64(-3.75,5.75)
  silkscreen extent -6.93,-6.79 6.79,6.79, body extent -6,-6 6,6, height 1.6
MODULE_ESP32-WROOM-32D-N4 [mm]
  rect 2x0.9 smd: 1(-8.5,5.26) 2(-8.5,3.99) 3(-8.5,2.72) 4(-8.5,1.45) 5(-8.5,0.18) 6(-8.5,-1.09) 7(-8.5,-2.36) 8(-8.5,-3.63) 9(-8.5,-4.9) 10(-8.5,-6.17) 11(-8.5,-7.44) 12(-8.5,-8.71) 13(-8.5,-9.98) 14(-8.5,-11.25) 25(8.5,-11.25) 26(8.5,-9.98) 27(8.5,-8.71) 28(8.5,-7.44) 29(8.5,-6.17) 30(8.5,-4.9) 31(8.5,-3.63) 32(8.5,-2.36) 33(8.5,-1.09) 34(8.5,0.18) 35(8.5,1.45) 36(8.5,2.72) 37(8.5,3.99) 38(8.5,5.26)
  rect 0.9x2 smd: 15(-5.715,-12.25) 16(-4.445,-12.25) 17(-3.175,-12.25) 18(-1.905,-12.25) 19(-0.635,-12.25) 20(0.635,-12.25) 21(1.905,-12.25) 22(3.175,-12.25) 23(4.445,-12.25) 24(5.715,-12.25)
  rect 1.33x1.33 smd: 39_1(-2.835,-0.405) 39_2(-1,-0.405) 39_3(0.835,-0.405) 39_4(-2.835,-2.24) 39_5(-1,-2.24) 39_6(0.835,-2.24) 39_7(-2.835,-4.075) 39_8(-1,-4.075) 39_9(0.835,-4.075)
  round 0.4 hole 0.3: 39_10(-1.917,-0.405) 39_11(-0.082,-0.405) 39_12(-2.835,-1.322) 39_13(-1,-1.322) 39_14(0.835,-1.322) 39_15(-1.917,-2.24) 39_16(-0.082,-2.24) 39_17(-2.835,-3.157) 39_18(-1,-3.157) 39_19(0.835,-3.157) 39_20(-1.917,-4.075) 39_21(-0.082,-4.075)
  Keep-Out Layer region: 9,6.45 -9,6.45 -9,12.75 9,12.75
  silkscreen extent -10.1,-12.75 9,12.75, body extent -9,-12.75 9,12.75, height 3.25
MOLEX_22-04-1021 [mm] "2.5mm (.100\") Pitch KK® Header, Single Row, Vertical, 2 Circuits"
  rect 1.9x1.9 hole 1.2: 1(-1.25,0)
  round 1.9 hole 1.2: 2(1.25,0)
  silkscreen extent -2.25,-2.6 2.25,3.2, body extent -2.25,-2.6 2.25,3.2, height 11.7
NRF24L01P [mm] "NRFL01+ Module"
  rect 1.5x1.5 hole 0.9: 1(0,0)
  round 1.5 hole 0.9: 2(0,2.54) 3(2.54,0) 4(2.54,2.54) 5(5.08,0) 6(5.08,2.54) 7(7.62,0) 8(7.62,2.54)
  silkscreen extent -1.72,-1.59 13.28,27.41, body extent -1.72,-1.59 13.28,27.41, height 15.5
"POT 4" [mil] "Trimmer"
  round 70 hole 40: 1(-94.49,-104.33) 2(94.49,-104.33) 3(0,104.33)
  silkscreen extent -141,-138 181,187, body extent -125,-144 127,145, height 187
REL_FINDER_40.61#1 [mm] "8 Leads, 1 Pole 16A Relay, FINDER 40.61 Series, Body 29mm x 12.4mm"
  oval 2.3x2 hole 1.3: 11(7.5,-3.75) 12(2.53,-3.76) 14(12.5,-3.75) 21(7.5,3.75) 22(2.5,3.75) 24(12.5,3.75) A1(-12.5,-3.75) A2(-12.5,3.75)
  silkscreen extent -15.5,-6.2 13.5,6.2, body extent -15.5,-6.2 13.5,6.2, height 25
REL_FINDER_40.61#2 [mm] "8 Leads, 1 Pole 16A Relay, FINDER 40.61 Series, Body 29mm x 12.4mm"
  round 3 hole 1.3: 11(7.5,-3.75) 21(7.5,3.75)
  oval 2.3x2 hole 1.3: 12(2.53,-3.76) 22(2.5,3.75)
  round 2.5 hole 1.3: 14(12.5,-3.75) 24(12.5,3.75) A1(-12.5,-3.75) A2(-12.5,3.75)
  silkscreen extent -15.5,-6.2 13.5,6.2, body extent -15.5,-6.2 13.5,6.2, height 25
"Relay 18.85x15.35x15.70" [mm]
  rect 2.5x2.2 hole 1.3: 1(0,-7.025)
  oval 2.5x2.2 hole 1.3: 2(-5.875,7.025) 3(5.875,7.025)
  oct 2.5x2.2 hole 1.3: 4(-5.875,-4.975) 5(5.875,-4.975)
  silkscreen extent -7.33,-8.28 7.33,9.88, body extent -7.37,-8.72 7.63,9.98, height 15.7
"Res Array" [mm]
  rect 1.3x1.3 hole 0.6: 1(0,0)
  round 1.3 hole 0.6: 2(0,-2.54) 3(0,-5.08) 4(0,-7.62) 5(0,-10.16) 6(0,-12.7) 7(0,-15.24) 8(0,-17.78) 9(0,-20.32)
  silkscreen extent -1,-21.46 1,1.5, body extent -0.62,-21.38 0.63,1.12, height 5.4
RESC1608X55N [mm] "Chip Resistor, EIA 0603, Metric 1608, Body 1.6x0.8mm, IPC Medium Density"
  rect 0.9x1 smd: 1(-0.8,0) 2(0.8,0)
  body extent -0.87,-0.47 0.88,0.48, height 0.55
RESC3413X04N [mm] "Chip Resistor, 2-Leads, Body 3/40x1/30mm, IPC Medium Density-Design:Abbas Basereh"
  rect 1.55x1.45 smd: 1(-1.35,0) 2(1.35,0)
  silkscreen extent -2.29,-0.89 2.29,0.89, body extent -1.25,-0.62 1.25,0.62, height 0.79
RESC4817X04N [mm] "Chip Resistor, 2-Leads, Body 4/80x1/70mm, IPC Medium Density-Design:Abbas Basereh"
  rect 1.65x1.75 smd: 1(-1.95,0) 2(1.95,0)
  silkscreen extent -2.92,-1.02 2.92,1.02, body extent -1.6,-0.8 1.6,0.8, height 1
SO16_M [mm] "16-Pin Small Outline Integrated Circuit 1.27 mm Pitch, IPC Low Density - DESIGNER ABBAS BASEREH"
  oval 2.5x0.7 smd: 1(-2.45,4.445) 2(-2.45,3.175) 3(-2.45,1.905) 4(-2.45,0.635) 5(-2.45,-0.635) 6(-2.45,-1.905) 7(-2.45,-3.175) 8(-2.45,-4.445) 9(2.45,-4.445) 10(2.45,-3.175) 11(2.45,-1.905) 12(2.45,-0.635) 13(2.45,0.635) 14(2.45,1.905) 15(2.45,3.175) 16(2.45,4.445)
  silkscreen extent -2.57,-5 0.8,5.47, body extent -3,-4.96 3,4.96, height 1.62
"SOD80, LL-34" [mm] "Diode, MiniMELF"
  round 0.5 on Mech15: 0(0,0)
  rrect25% 1.1x1.65 smd: 1(1.65,0) 2(-1.65,0)
  silkscreen extent -0.76,-0.76 0.76,0.76, body extent -1.88,-0.79 1.82,0.79, height 1.6
SOIC127P599X175-8N [mm]
  rrect25% 1.97x0.6 smd: 1(-2.47,1.905) 2(-2.47,0.635) 3(-2.47,-0.635) 4(-2.47,-1.905) 5(2.47,-1.905) 6(2.47,-0.635) 7(2.47,0.635) 8(2.47,1.905)
  silkscreen extent -4.14,-2.52 1.95,2.52, body extent -3,-2.45 3,2.45, height 1.75
SOIC127P790X216-8N [mm]
  rrect15% 1.61x0.58 smd: 1(-3.605,1.905) 2(-3.605,0.635) 3(-3.605,-0.635) 4(-3.605,-1.905) 5(3.605,-1.905) 6(3.605,-0.635) 7(3.605,0.635) 8(3.605,1.905)
  silkscreen extent -5.25,-2.69 2.67,2.69, body extent -3.95,-2.64 3.95,2.64, height 2.16
SOP-16 [mil]
  rect 80x26 smd: 1(-121,175) 2(-121,125) 3(-121,75) 4(-121,25) 5(-121,-25) 6(-121,-75) 7(-121,-125) 8(-121,-175) 9(121,-175) 10(121,-125) 11(121,-75) 12(121,-25) 13(121,25) 14(121,75) 15(121,125) 16(121,175)
  silkscreen extent -77,-200 77,200, body extent -118,-195 118,195, height 69
SOT95P237X112-3N [mm]
  rrect50% 1.3x0.59 smd: 1(-1.025,0.95) 2(-1.025,-0.95) 3(1.025,0)
  silkscreen extent -2.32,-1.57 0.7,1.57, body extent -1.25,-1.46 1.25,1.46, height 1.12
SOT95P260X140-3N [mm]
  rrect25% 1.5x0.6 smd: 1(-1.19,0.95) 2(-1.19,-0.95) 3(1.19,0)
  silkscreen extent -2.39,-1.45 0.75,1.75, body extent -1.3,-1.45 1.3,1.45, height 1.4
SOT223 [mm] "SOT223, 4-Leads, Body 6.5x3.5mm, Pitch 2.30mm-Designer Abbas Basereh"
  oval 2.2x1 smd: 1(-3.2,2.3) 2(-3.2,0) 3(-3.2,-2.3)
  rect 2.2x3.2 smd: 4(3,0)
  Top Layer pour cut-out: -1.7,3.556 1.7,3.556 1.7,-3.556 -1.7,-3.556
  silkscreen extent -3.02,-3.4 1.9,3.47, body extent -3.5,-3.25 3.5,3.25, height 1.7
Switch_11_11 [mm]
  round 3 hole 1.5: 1(4.826,8.89) 1(17.907,8.89) 2(4.826,3.81) 2(17.907,3.81)
  silkscreen extent 5.88,1.04 16.88,12.04
TO170P1435X465-6N-R1041X635 [mm] "TO-263, 5 Leads, 1.70mm pitch; TO, 14.35mm L X 8.64mm W X 4.65mm H body IPC Medium Density"
  rect 2.8x1.05 smd: 1(-6.2,3.4) 2(-6.2,1.7) 3(-6.2,0) 4(-6.2,-1.7) 5(-6.2,-3.4)
  rect 6.85x10.5 smd: 6(4.15,0)
  silkscreen extent -7.47,-5.1 0.35,5.1, body extent -7.11,-5.2 7.24,5.21, height 4.64
TO-220 [mm]
  oval 1.508x3.016 hole 1.3: 1(-2.54,0) 2(0,0) 3(2.54,0)
  silkscreen extent -5.08,-1.91 5.08,2.54, body extent -5.14,-1.84 5.14,2.61, height 19.06
USB2.5-2H4C [mm] "Connector; USB1.1, Type A, Thru-Hole; 4 Position; Right Angle DESIGNER ABBAS BASEREH"
  rect 1.9x1.6 hole 1: 1(-5.49,-3.5)
  oval 1.9x1.6 hole 1: 2(-5.49,-1) 3(-5.49,1) 4(-5.49,3.5)
  round 3.8 hole 2.3: 4(-2.78,6.57) 4(-2.78,-6.57)
  silkscreen extent -6.97,-6.56 7,6.56, body extent -6.9,-7.9 7.6,7.9, height 7.35
WURTH_140817143400#1 [mm] "DIP Gull Wing Surface Mount, 2.54mm Pitch; 4 Pin, 6.5mm W X 4.58mm L X 3.9mm H body, WURTH"
  rect 1.8x1.4 smd: 1(-4.593,1.27) 2(-4.593,-1.27) 3(4.593,-1.27) 4(4.593,1.27)
  silkscreen extent -4.72,-2.29 3.46,2.42, body extent -5.07,-2.29 5.08,2.29, height 3.6
WURTH_140817143400#2 [mm] "DIP Gull Wing Surface Mount, 2.54mm Pitch; 4 Pin, 6.5mm W X 4.58mm L X 3.9mm H body, WURTH"
  rect 1.6x1 smd: 1(-4.593,1.27) 2(-4.593,-1.27) 3(4.593,-1.27) 4(4.593,1.27)
  silkscreen extent -4.72,-2.29 3.46,2.43, body extent -5.07,-2.29 5.08,2.29, height 3.6
XTAL_ABS09-32.768KHZ-T [mm]
  rect 1.1x1.9 smd: 1(-1.7,0) 2(1.7,0)
  silkscreen extent -0.83,-0.75 0.83,0.75, body extent -2.05,-0.75 2.05,0.75, height 0.88

## Part data
ALCD1: "Alphanumic LCD", Data=16-12-2016, Designer="Abbas Basereh"
BT1: library part "Battry Backup", "Battry Backup", Data=16-12-2016, Designer="Abbas Basereh"
C1 C2 C3 C4 C5 C6 C8 C9 C10 C11 C12: library part "Cap ELECTROLITIC TOTAL SIZE", "Cap electrolitic radial", Data=16-12-2016, Designer="Abbas Basereh"
C7: library part Cap-Bipolar, "Bipolar Capacitor", Voltage=100V, Adding Date=1387/12/20, Designer="Saeid Jorablo", Organazation=ControTec
C13 C22 C25 C27 C32 C33 C34 C35 C36 C37 C40 C41 C42 C43 C44 C45 C46 C47 C48 C49: library part "CAP SMD 0805", "CAP 0805", Data=16-12-2016, Desc.="CAP SMD 0805", Designer="Abbas Basereh"
C14 C15 C16 C17 C18 C19 C20 C21 C23 C24 C26 C28 C29 C30 C31 C38 C39: library part "Cap 0603", "0603 C 100nF Ceramic Multilayer Capacitor, 25 V, +125degC, X7R Dielectric, +/-5%", Package="603-2 KEMET", Check_prices=https://www.snapeda.com/parts/C0603C104J3RACTU/KEMET/view-part/?ref=eda, MF=KEMET, MP=C0603C104J3RACTU, SnapEDA_Link=https://www.snapeda.com/parts/C0603C104J3RACTU/KEMET/view-part/?ref=snap
CR1: Manufacturer_Part_Number=BTA41-600BRG, Built_By=EMA_UL_Team, C="Copyright (C) 2015 Accelerated Designs. All rights reserved", SourceLibrary=StMicro_2011-06-07, Vendor=STMicroelectronics
D1 D2 D3 D4 D5 D6 D7 D8: "Light Emitting Diode", Data=16-12-2016, Designer="Abbas Basereh"
D9 D10 D11 D12 D13 D14 D15 D16 D17 D18 D19 D20: library part "Diode SMD Package", "Diode SMD Pakage"
DC1: "2W, constant voltage input, isolated ,unregulated single output, DC DC power module", Package=None, Availability=Unavailable, MP=RKZE-1205S/HP, PRICE=None
DZ1: library part "ZENER GENERAL DIODE", "DIODE ZENER GENERAL", ComponentLink1Description="Manufacturer Link", ComponentLink2Description=Datasheet, PackageDescription="DIODE GEN ZENER", PackageReference="DO 35", PackageVersion=2017-1-12, Published=2017-1-12, Publisher="Abbas Basereh"
GSM1: library part "USB A-Type", "USB Connector-A Type"
IC1 IC2 IC3 IC4 IC5 IC6 IC7 IC8 IC9: library part 140817143400, "Single Optocoupler-PC817", Case="DIP4 SMD", Manufacturer=WURTH, Author="CERN DEM HF", Bonding=No, ComponentHeight=3.9mm, Component Type=Standard, CreateDate=4/5/2023, Device=140817143400, HelpURL=\\cern.ch\dfs\Applications\Altium\Datasheets\WURTH_140817143400.pdf, LatestRevisionDate=4/5/2023, Manufacturer Part Number=140817143400, Mounted=Yes, PackageDescription="DIP Gull Wing Surface Mount, 2.54mm Pitch; 4 Pin, 6.5mm W X 4.58mm L X 3.9mm H body, WURTH", Part Description="WL-OCPT Optocoupler Phototransistor", Part Number=140817143400, Pin Count=4, PressFit=No, Sense=No, SMD=Yes, Socket=No
IC10: library part LM2596S-5.0/NOPB, "SIMPLE SWITCHER® Power Converter 150kHz, 3A Step-Down Voltage Regulator", Case=TO-263-5, Manufacturer="TEXAS INSTRUMENTS", Manufacturer Part Number=LM2596S-5.0, Author="CERN DEM JLC", Bonding=No, Component Type=Standard, ComponentHeight=4.65mm, CreateDate=12/19/2018, Device=LM2596S-5.0/NOPB, HelpURL=\\cern.ch\dfs\Applications\Altium\Datasheets\LM2596S-5.0-NOPB.pdf, LatestRevisionDate=6/1/2022, Mounted=Yes, PackageDescription="D2PAK TO-263, TO, 1.70mm Pitch; 5 Pin, 14.35mm L X 8.64mm W X 4.65mm H body IPC Medium Density", Part Description="4.5V to 40V Input to 5V Output, SIMPLE SWITCHER® Power Converter 150kHz, 3A Step-Down Voltage Regulator", Part Number=LM2596S-5.0/NOPB, Pin Count=6, PressFit=No, Sense=No, SMD=Yes, Socket=No
J1: "DC Power Jack. Center Pin 2.5mm. Diameter: 5.7mm", Adding Date=10/21/2009, Company=Personal, Designer="Ali Hafizi", Project Name=Laser
j2 j3: "0.5mm pins"
K1 K2 K3 K4: library part Switch_11_11
K5 K6 K7 K8 K9: "SPDT Relay", Company=E.P.I.L, Design_Date=2011/10/31, Designer="Eng. Saeid Jorablo"
L1: library part IND_33UH_20%_PANASONIC_ELL6RH330M, "Inductor With Magnetic core 1Dot", Manufacturer=PANASONIC, Manufacturer Part Number=ELL6RH330M, Power=600mA, Resistance=0.38R, Tolerance=±20%, Author="CERN DEM JMW", Component Type=Standard, ComponentHeight=2.8mm, CreateDate=1/9/2009, HelpURL=\\cern.ch\dfs\Applications\Altium\Datasheets\IND_PANASONIC_ELL6RH.pdf, LatestRevisionDate=1/9/2009, Mounted=Yes, Part Description="SMD Choke Coil", Part Number=IND_33UH_20%_PANASONIC_ELL6RH330M, Pin Count=2, Sense=No, SMD=Yes, Socket=No
M1 M2 M3 M4 M5: library part "Board Screw 3mm", "Board Screw With Spacer 3mm", Data=16-12-2016, Designer="Abbas Basereh"
MOC1: library part MOC3021-3, "Opto-Triac", Designer="Seyed Mohsen Ghasemian", E-mail=picpars@gmail.com, LatestRevisionDate=17-11-2011, Published=17-11-2011, Publisher=www.picpars.com, WEB=www.picpars.com
Mos1: "N-Channel 55V 51A _Tc_ 80W _Tc_ Through Hole TO-220AB", Package="TO-220 Infineon Technologies", Availability=Unavailable, MF="Infineon Technologies", MP=IRFZ44, PRICE=None, SnapEDA_Link=https://www.snapeda.com/parts/IRFZ44/Infineon%20Technologies/view-part/568085/?ref=snap
NRF1: library part NRF24L01P, "RF Module", Ali Hafizi=Creature
P1: library part "Header 5", "Header, 5-Pin", LatestRevisionDate=17-Jul-2002, LatestRevisionNote="Re-released for DXP Platform.", Publisher="Altium Limited"
P2 P3: "Header, 5-Pin", LatestRevisionDate=17-Jul-2002, LatestRevisionNote="Re-released for DXP Platform.", Publisher="Altium Limited"
POT1 POT2: library part POT, "Variable Resistor"
Q1: "N-Channel 30 V 5.8A (Ta) 1.5W (Ta) Surface Mount SOT-23", Package=None, Availability="In Stock", Check_prices=https://www.snapeda.com/parts/AO3400-5.8A/MDD/view-part/?ref=eda, MF=MDD, MP=AO3400-5.8A, PRICE=None, Purchase-URL=https://pricing.snapeda.com/search/part/AO3400-5.8A/?ref=eda, SnapEDA_Link=https://www.snapeda.com/parts/AO3400-5.8A/MDD/view-part/?ref=snap
Q2: "P-Channel 20 V 3.7A (Ta) 1.3W (Ta) Surface Mount Micro3Ã¢â€žÂ¢ /SOT-23", Package="SOT-23-3 ON Semiconductor", Check_prices=https://www.snapeda.com/parts/IRLML6402TRPBF/Infineon/view-part/?ref=eda, MF=Infineon, MP=IRLML6402TRPBF, SnapEDA_Link=https://www.snapeda.com/parts/IRLML6402TRPBF/Infineon/view-part/?ref=snap
R1: library part "RES Array", "Resistor Pack"
R2 R3 R4: library part "RES Axial 0.25W", "RES Axial 0.25W", Data=4-1-2017, Desc.="RES Axial 0.25W", Designer="Abbas Basereh"
R5 R6 R9 R10 R11 R12: library part R0603_100K_0.1%_0.063W_10PPM, "Resistor - 0.1%", Case=0603, Manufacturer=GENERIC, Manufacturer1 ComponentHeight=0.55mm, Manufacturer1 Example="TYCO HOLSWORTHY", Manufacturer1 Part Number=RN73C1J100KBTDF, Power=0.063W, Tolerance=±0.1%, Author="CERN DEM JLC", Component Type=Standard, CreateDate=12/3/2007, HelpURL=\\cern.ch\dfs\Applications\Altium\Datasheets\R0603_Tyco_RN73.pdf, LatestRevisionDate=3/13/2008, Manufacturer Part Number=R0603_100K_0.1%_0.063W_10PPM, Mounted=Yes, Part Description="Thin Film Chip Resistor", Part Number=R0603_100K_0.1%_0.063W_10PPM, Pin Count=2, PressFit=No, Sense=No, SMD=Yes, Socket=No, Status="Not Recommended", TC=±10ppm
R7 R8 R13 R14 R15 R16 R17 R18 R19 R20 R21 R22 R23 R25 R27 R29 R31 R33 R34 R37 R38 R40 R42 R44: library part "RES 0805 0.125W", "RES 0805", Data=16-12-2016, Desc.="RES SMD 0805", Designer="Abbas Basereh"
R24 R26 R28 R30 R32 R35 R36 R39 R41 R43: library part "RES 1206 0.25W", "RES 1206", Data=16-12-2016, Desc.="RES SMD 1206", Designer="Abbas Basereh"
RL1 RL2: library part REL_FINDER_40.61.9.009.0000, "16A SPDT PCB Relay, 40.61 Serie", Manufacturer=FINDER, Manufacturer Part Number=40.61.9.009.0000, Author="CERN DEM JLC", Component Type=Standard, ComponentHeight=25mm, CreateDate=8/6/2012, HelpURL=\\cern.ch\dfs\Applications\Altium\Datasheets\REL_FINDER_40.61.pdf, LatestRevisionDate=8/30/2018, Mounted=Yes, PackageDescription="8 Leads, 1 Pole 16A Relay, FINDER 40.61 Serie, Body 29mm x 12.4mm", Part Description="16A, SPDT PCB Relay, 40 Series", Part Number=REL_FINDER_40.61.9.009.0000, Pin Count=8, PressFit=No, Sense=Yes, Sense Comment=Non-washable, SMD=No, Socket=No, Status="Not Recommended", Status Comment="Sensitive (See Sensitive Field)"
Sp1: library part MOLEX_22-04-1021, "Connector 2 Male", Manufacturer=MOLEX, Manufacturer Part Number=22-04-1021, Author="CERN DEM JLC", Component Type=Standard, ComponentHeight=11.7mm, CreateDate=2/9/2012, Family=KK®, HelpURL=\\cern.ch\dfs\Applications\Altium\Datasheets\MOLEX_22-04-1021.pdf, LatestRevisionDate=2/9/2012, Mounted=Yes, Part Description="2.5mm (.100\") Pitch KK® Wire-to-Board Header, Vertical, with Friction Lock, 2 Circuits, Tin (Sn) Plating", Part Number=MOLEX_22-04-1021, Pin Count=2, PressFit=No, Sense=No, SMD=No, Socket=No, Status=Obsolete
T1 T2 T3 T4 T5: "DG35C_Contacts pitch    8.25 mm"
U1 U2: "HIGH SPEED-10 MBit/s  LOGIC GATE OPTOCOUPLERS", Adding Date=1387/01/08, Company=ControTEK, Designer="Saeid Jorablo"
U3: "ARMÂ® CortexÂ®-M4F STM32G4 Microcontroller IC 32-Bit Single-Core 170MHz 128KB (128K x 8) FLASH 64-LQFP (10x10)", Package="LQFP-64 STMicroelectronics", Check_prices=https://www.snapeda.com/parts/STM32G431RBT6/STMicroelectronics/view-part/?ref=eda, MF=STMicroelectronics, MP=STM32G431RBT6, SnapEDA_Link=https://www.snapeda.com/parts/STM32G431RBT6/STMicroelectronics/view-part/?ref=snap
U4 U6: library part ISO7221AD, "CA-IS3722 High-Speed Dual-Channel Digital Isolators", Package="SOIC-8 Texas Instruments", Check_prices=https://www.snapeda.com/parts/ISO7221AD/Texas+Instruments/view-part/?ref=eda, MF="Texas Instruments", MP=ISO7221AD, SnapEDA_Link=https://www.snapeda.com/parts/ISO7221AD/Texas+Instruments/view-part/?ref=snap
U5: "FLASH - NOR Memory IC 64Mb (8M x 8) SPI 80 MHz 8-SOIC", Package="SOIC-8 Winbond", Check_prices=https://www.snapeda.com/parts/W25Q64BVSSIG/Winbond/view-part/?ref=eda, MF="Winbond Electronics", MP=W25Q64BVSSIG, SnapEDA_Link=https://www.snapeda.com/parts/W25Q64BVSSIG/Winbond/view-part/?ref=snap
U7: "Audio Amp Speaker 2-CH Stereo 3.2W Class-D 16-Pin SOP T/R", Package=None, Check_prices=https://www.snapeda.com/parts/PAM8403/Diodes+Inc./view-part/?ref=eda, MF="Diodes Zetex", MP=PAM8403, SnapEDA_Link=https://www.snapeda.com/parts/PAM8403/Diodes+Inc./view-part/?ref=snap
U8: "SEVEN DARLINGTON ARRAYS", ComponentLink1Description=Datasheet, ComponentLink2URL=http://www.st.com, DatasheetVersion="STMicroelectronics GROUP OF COMPANIES", PackageDescription="16-Pin Small Outline Integrated Circuit 1.27 mm Pitch, IPC High Density", PackageReference=SO16_N, PackageVersion=2017-3-2, Published=2017-3-2, Publisher="Abbas Basereh", Supplier 1=Digi-Key, Supplier 2=Mouser, Supplier Part Number 1=ULN2003A, Supplier Part Number 2=ULN2003A
U9: "Bluetooth, WiFi 802.11b/g/n, Bluetooth v4.2 +EDR, Class 1, 2 and 3 Transceiver Module 2.4GHz ~ 2.5GHz Integrated, Trace Surface Mount", Package="Non Standard Espressif Systems", Check_prices=https://www.snapeda.com/parts/ESP32-WROOM-32D-N4/Espressif+Systems/view-part/?ref=eda, MF="Espressif Systems", MP=ESP32-WROOM-32D-N4, SnapEDA_Link=https://www.snapeda.com/parts/ESP32-WROOM-32D-N4/Espressif+Systems/view-part/?ref=snap
UP1 UP2: library part AMS1117-x.x, "x.x Volt, 800mA Low-Dropout Linear Regulator, 4-pin SOT-223", Data=16-12-2016, Designer="Ali Hafizi"
Y1: library part XTAL, "XTAL Crystal", ComponentLink1Description=Datasheet, ComponentLink2Description=Reference, Design Date=2017-1-3, Designer="ABBAS BASEREH", Mounting Technology="Surface Mount\Through-Hole", Status=Unreleased
Y2: library part Crystal-ABS09-32.768KHZ-T, "32.768 kHz Â±20ppm Crystal 12.5pF 70 kOhms 2-SMD, No Lead", Package="SMD-2 Abracon LLC", Availability="In Stock", Check_prices=https://www.snapeda.com/parts/ABS09-32.768KHZ-T/Abracon+LLC/view-part/?ref=eda, MF="Abracon LLC", MP=ABS09-32.768KHZ-T, PRICE=None, Purchase-URL=https://pricing.snapeda.com/search/part/ABS09-32.768KHZ-T/?ref=eda, SnapEDA_Link=https://www.snapeda.com/parts/ABS09-32.768KHZ-T/Abracon+LLC/view-part/?ref=snap

## Free pads (board coordinates)
  round 2.5 hole 1.3: 2(90.805,12.827) 3(91.821,12.827) 4(95.885,12.827) 5(96.901,12.827) 6(90.678,4.064) 7(91.694,4.064) 8(95.758,4.064) 9(96.774,4.064)

## Via types
v1: diameter 1.27, hole 0.711, Top Layer to Bottom Layer, tented both sides, 237 vias
v2: diameter 0.5, hole 0.3, Top Layer to Bottom Layer, 40 vias
v3: diameter 1.6, hole 1, Top Layer to Bottom Layer, tented both sides, 8 vias
v4: diameter 0.5, hole 0.3, Top Layer to Bottom Layer, tented both sides, 6 vias